# Altium PCB TZ-SB-0001-PCB-[A] (HydroScope Mainboard).PcbDoc (part 4 of 4)
Units mil, origin at the board's own origin, x right, y up, seen from the top; angles counter-clockwise.
Board outline 4500 x 970 mil, 4 copper layers (Top Layer, GND-PWR, GND, Bottom Layer), stack 64.112 mil thick; 165 components, 114 nets, 573 pads, 320 vias.
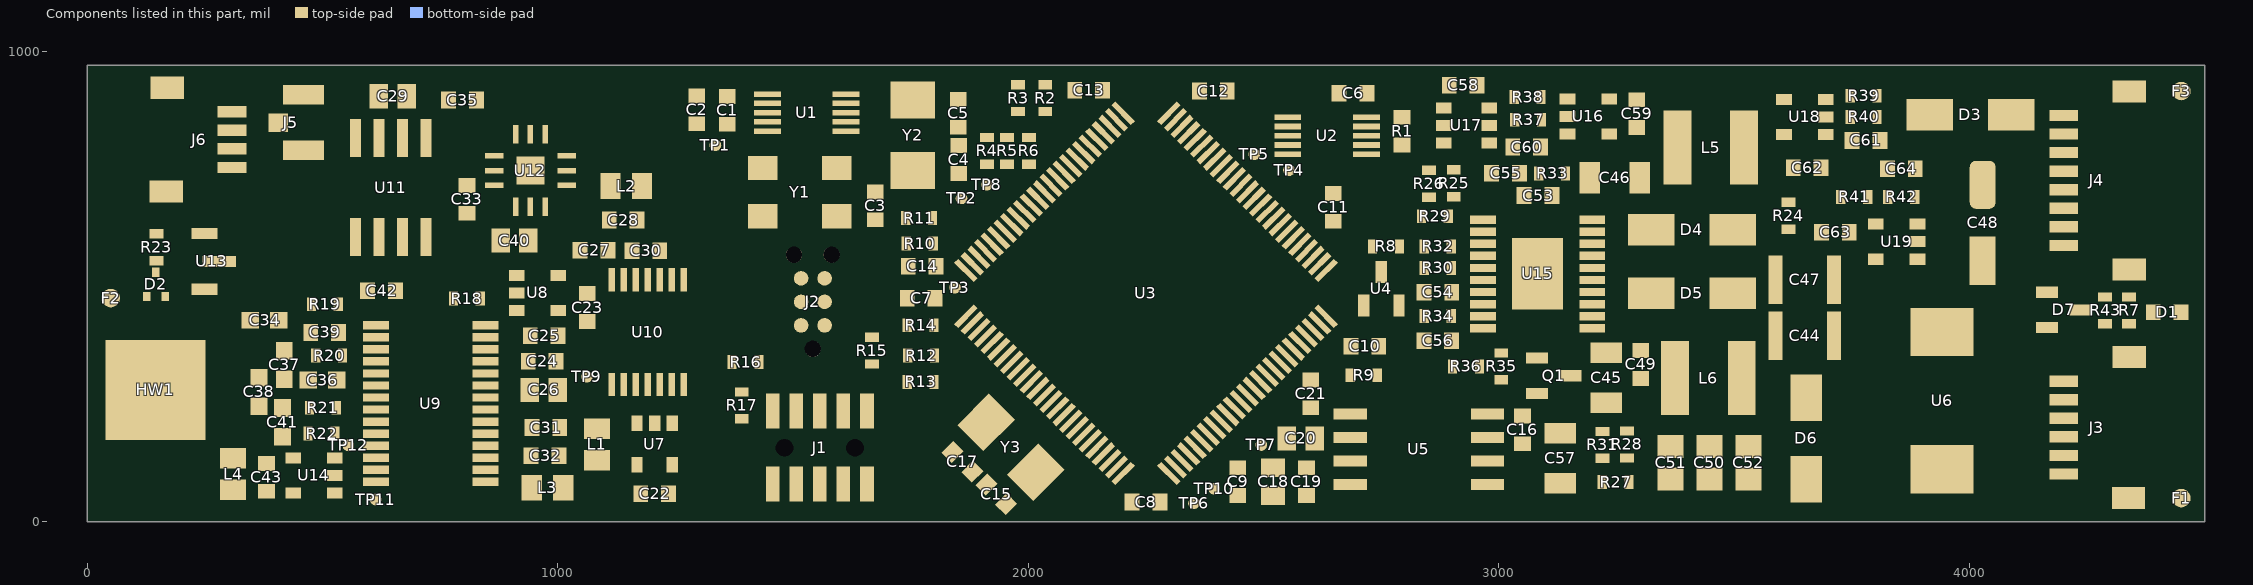
[diagram p5: the components of this part, seen from the top]

## Silkscreen, mask and mechanical layers (free items; w line width, h text height) (continued)
Bottom Overlay:
  the board outline again, w25
  text "www.tzerolabs.com" at 2912,802 h250
  text "b" at 200,620 h275
  text "Automated, not robotic." at 3619,345 h450
  text "d" at 200,51 h275
  text "b" at 4458,22 h220
  text "TZ-SB-0001-[A]  V2019-02-08" at 3228,16 h75
  text "c" at 106,15 h275
Bottom Solder:
  text "a" at 200,41 h275
[8] Board Outline:
  lines w1: 0,970 0,0 4500,0 4500,970